# Altium PCB PCB2.PcbDoc
Units mil, origin at the board's own origin, x right, y up, seen from the top; angles counter-clockwise.
Board outline 6000 x 4000 mil, 2 copper layers (Top Layer, Bottom Layer); 73 components, 56 nets, 279 pads, 0 vias.
Unrouted connection lines stored in the file: 188.
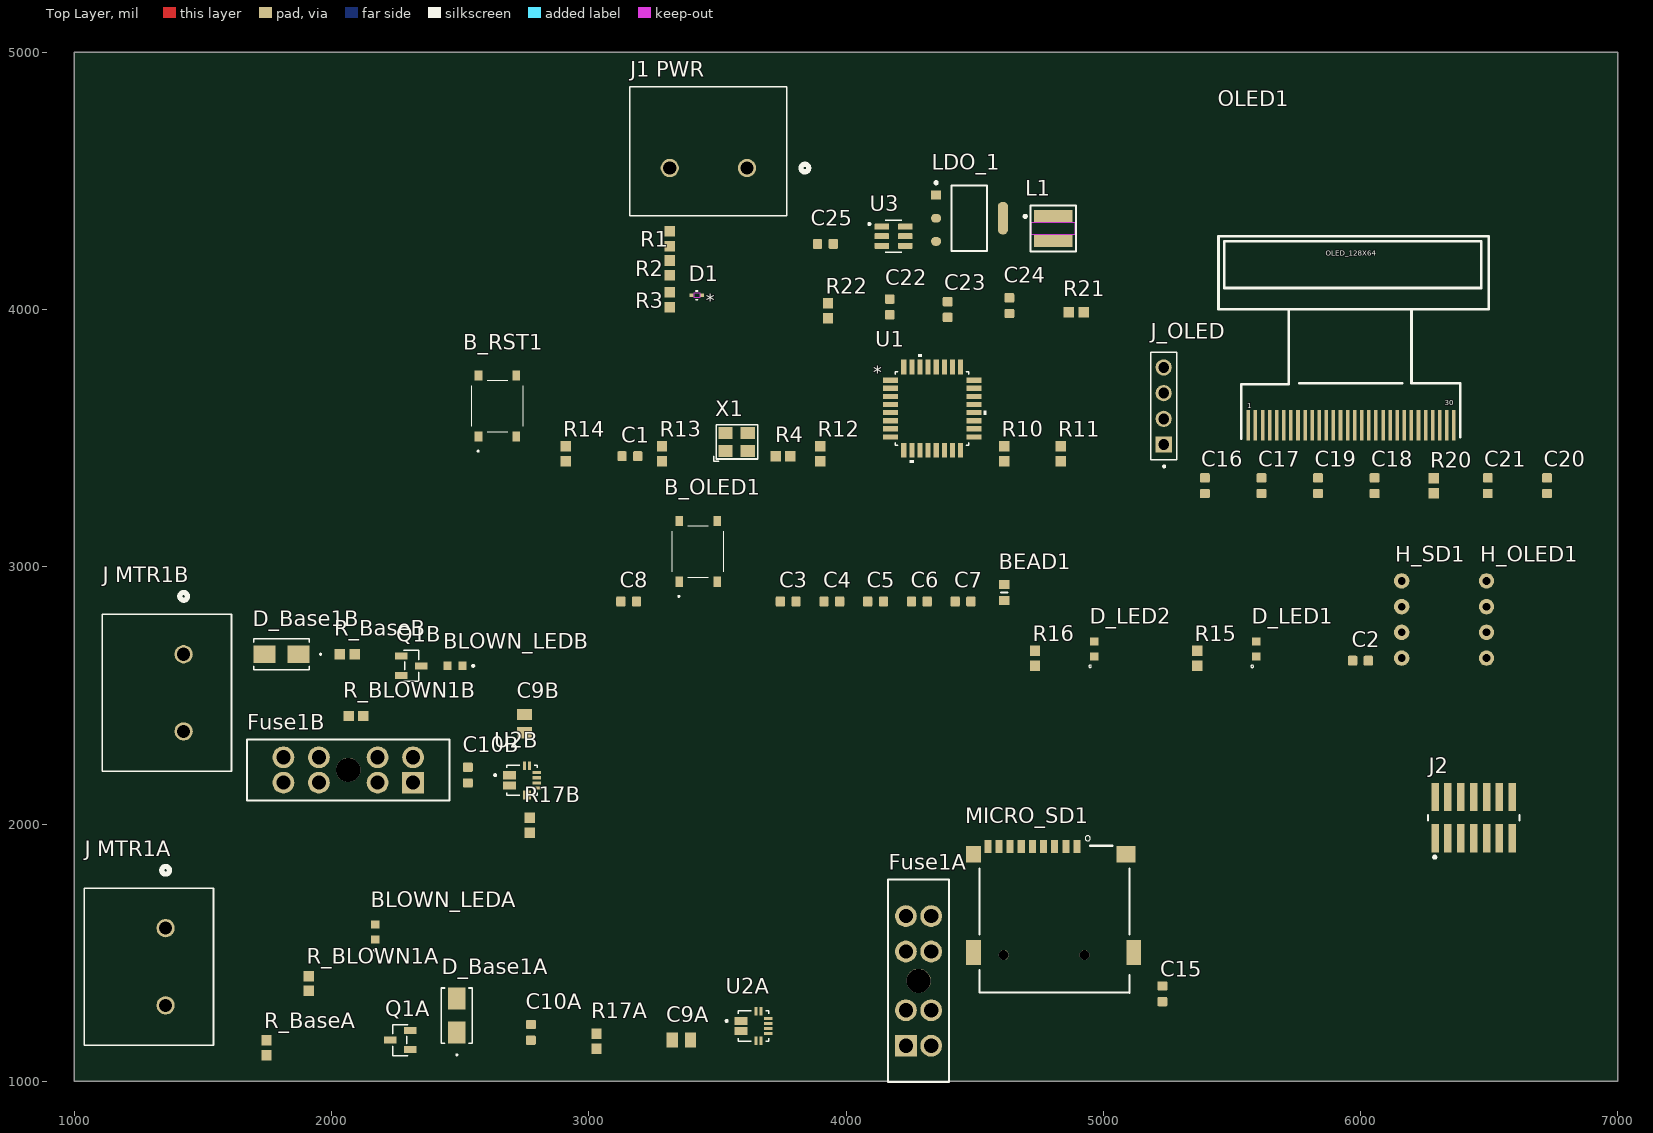
[diagram p0: Top Layer view]
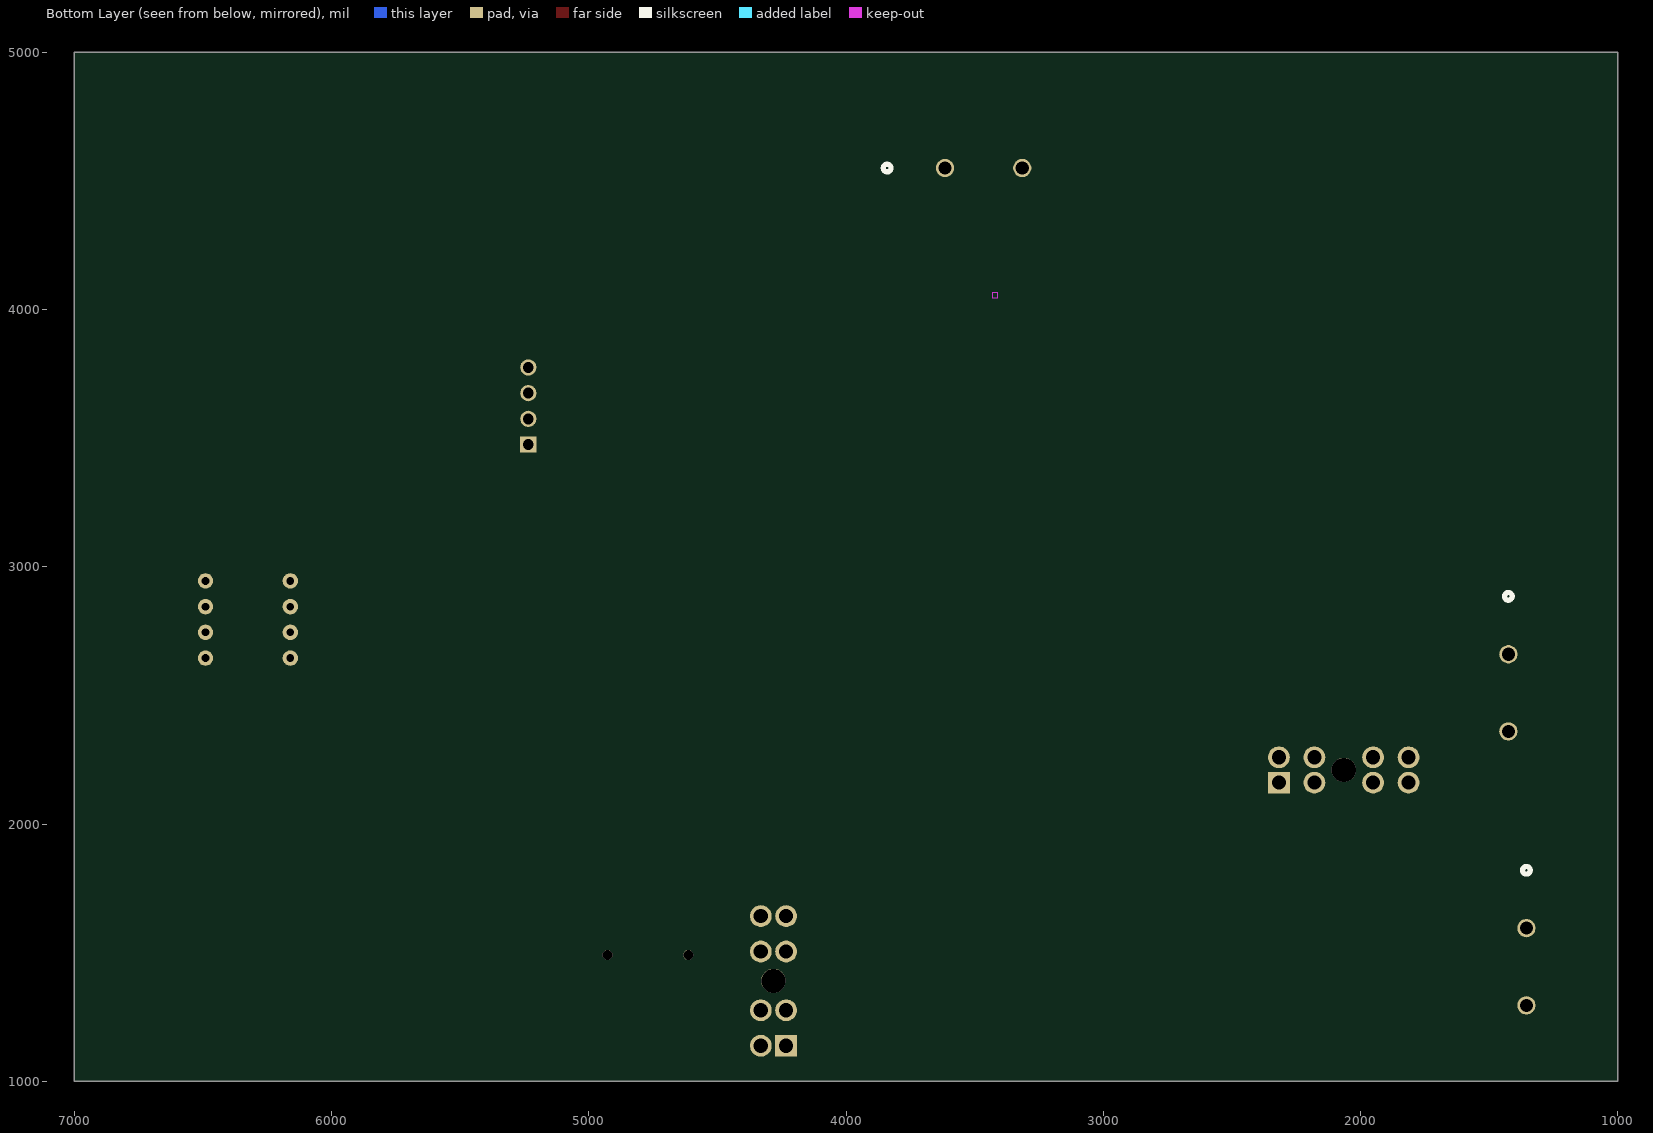
[diagram p1: Bottom Layer view, seen from below]

## Layer stack, top to bottom
Top Solder: solder mask 0.4, Solder Resist, Dk 3.5
Top Layer: signal copper 1.4
Dielectric 1: dielectric 12.6, FR-4, Dk 4.8
Bottom Layer: signal copper 1.4
Bottom Solder: solder mask 0.4, Solder Resist, Dk 3.5

## Board outline
1000,1000 7000,1000 7000,5000 1000,5000

## Design rules (kind name [scope] priority, off if disabled: settings)
Clearance [All] p1: gap=10 ignorepadtopadclearanceinfootprint=FALSE
PolygonConnect [All] p1: connectstyle=Relief reliefconductorwidth=10 reliefentries=4 polygonreliefangle="90 Angle" airgapwidth=10
RoutingVias [All] p1: holewidth=28 width=50 viastyle="Through Hole" minholewidth=28 minwidth=50 maxholewidth=28 maxwidth=50
SolderMaskExpansion [All] p1: expansion=4 istentingtop=FALSE
SupplyNets "Schematic Supply Nets_3" [InNet('3V3')] p1: voltage=0.000
SupplyNets "Schematic Supply Nets_2" [InNet('26V1')] p2: voltage=0.000
SupplyNets "Schematic Supply Nets_1" [InNet('GND')] p3: voltage=0.000
SupplyNets "Schematic Supply Nets" [InNet('AVDD')] p4: voltage=0.000
Width [All] p1: maxlimit=10 minlimit=10 preferedwidth=10
30 further rules are at their usual default settings.

## Classes and differential pairs
channel class Fuse: F1 F2
channel class Ammeter: I1 I2
net class Vi_motor[1..2]: Vi_motor1 Vi_motor2

## Components (designator, comment, footprint, x,y, rotation, side; value= is the part's Value field where it differs from the comment)
B_OLED1 "Button Switch" TS1187ABAB 3425,3060 r90 top
B_RST1 "Button Switch" TS1187ABAB 2645,3625 r90 top
BEAD1 "GZ1608D601TF" BEADC1608X95N 4615,2900 r90 top
BLOWN_LEDA "KT-0603R" LED_KT-0603R 2170,1580 r90 top (schematic designator BLOWN_LED)
BLOWN_LEDB "KT-0603R" LED_KT-0603R 2480,2615 r180 top (schematic designator BLOWN_LED)
C1 "C0603C105K4RACTU" CAPC1608X90N 3160,3430 r0 top value=10nF
C2 "C0603C105K4RACTU" CAPC1608X90N 6000,2635 r0 top value=100nF
C3 "C0603C105K4RACTU" CAPC1608X90N 3775,2865 r0 top value=1uF
C4 "C0603C105K4RACTU" CAPC1608X90N 3945,2865 r0 top value=10nF
C5 "C0603C105K4RACTU" CAPC1608X90N 4115,2865 r0 top value=4.7uF
C6 "C0603C105K4RACTU" CAPC1608X90N 4285,2865 r0 top value=100nF
C7 "C0603C105K4RACTU" CAPC1608X90N 4455,2865 r0 top value=100nF
C8 "C0603C105K4RACTU" CAPC1608X90N 3155,2865 r0 top value=10nF
C9A "CC0805KRX7R9BB104" CAP-0805 3360,1160 r0 top (schematic designator C9)
C9B "CC0805KRX7R9BB104" CAP-0805 2750,2390 r270 top (schematic designator C9)
C10A "C0603C105K4RACTU" CAPC1608X90N 2775,1190 r90 top value=1nF (schematic designator C10)
C10B "C0603C105K4RACTU" CAPC1608X90N 2530,2190 r90 top value=1nF (schematic designator C10)
C15 "C0603C105K4RACTU" CAPC1608X90N 5230,1340 r90 top value=100nF
C16 "C0603C105K4RACTU" CAPC1608X90N 5395,3315 r270 top value=2.2uF
C17 "C0603C105K4RACTU" CAPC1608X90N 5615,3315 r270 top value=2.2uF
C18 "C0603C105K4RACTU" CAPC1608X90N 6055,3315 r270 top value=100nF
C19 "C0603C105K4RACTU" CAPC1608X90N 5835,3315 r270 top value=10uF
C20 "C0603C105K4RACTU" CAPC1608X90N 6725,3315 r270 top value=10uF
C21 "C0603C105K4RACTU" CAPC1608X90N 6495,3315 r270 top value=10uF
C22 "C0603C105K4RACTU" CAPC1608X90N 4170,4010 r90 top value=680nF
C23 "C0603C105K4RACTU" CAPC1608X90N 4395,4000 r90 top value=100nF
C24 "C0603C105K4RACTU" CAPC1608X90N 4635,4015 r90 top value=6.8nF
C25 "C0603C105K4RACTU" CAPC1608X90N 3920,4255 r0 top value=47uF
D1 "DF2S6.2FS,L3M" SOD-923_TOS 3420,4055 r180 top
D_Base1A "Diode" M7_MDD 2487,1255 r90 top (schematic designator D_Base1)
D_Base1B "Diode" M7_MDD 1805,2660 r180 top (schematic designator D_Base1)
D_LED1 "LTST-C190GKT" LEDM1608X80 5595,2680 r90 top
D_LED2 "LTST-C190GKT" LEDM1608X80 4965,2680 r90 top
Fuse1A "178.6165.0002" FP-178_6165-MFG 4282,1390 r90 top (schematic designator Fuse1)
Fuse1B "178.6165.0002" FP-178_6165-MFG 2065,2210 r180 top (schematic designator Fuse1)
H_OLED1 "4-pin Header" "4-pin Header" 6490,2645 r0 top
H_SD1 "4-pin Header" "4-pin Header" 6160,2645 r0 top
"J1 PWR" "1868076" CONN_1868076_PXC 3615,4550 r180 top
J2 "FTSH-107-01-L-DV-K" FP-FTSH-107-01-L-DV-K-MFG 6440,2025 r0 top
"J MTR1A" "1868076" CONN_1868076_PXC 1355,1595 r270 top (schematic designator "J MTR1")
"J MTR1B" "1868076" CONN_1868076_PXC 1425,2660 r270 top (schematic designator "J MTR1")
J_OLED "PPTC041LFBN-RC" SULLINS_PPTC041LFBN-RC 5235,3625 r90 top
L1 "74439325056" WE-XHMI_4040 4805,4315 r0 top
LDO_1 "AMS1117-3.3" FP-AMS1117-IPC_C 4480,4355 r0 top
MICRO_SD1 "TF-01A" TF-01A 4810,1630 r0 top
OLED1 "N096-2864KSWEG01-H30" OLED_0.96-30P-P0.70-12864 5963.78,3549.99 r0 top
Q1A "SS8050(RANGE:200-350)" SOT-23-3_L2.9-W1.3-P1.90-LS2.4-BR 2267,1160 r0 top (schematic designator Q1)
Q1B "SS8050(RANGE:200-350)" SOT-23-3_L2.9-W1.3-P1.90-LS2.4-BR 2310,2615 r180 top (schematic designator Q1)
R1 "RC0603FR-07100KL" RESC1607X60N 3315,4275 r90 top value=300kΩ
R2 "RC0603FR-07100KL" RESC1607X60N 3315,4161.73 r90 top value=510kΩ
R3 "RC0603FR-07100KL" RESC1607X60N 3315,4038.27 r90 top value=100kΩ
R4 "RC0603FR-07100KL" RESC1607X60N 3755,3430 r0 top value=10kΩ
R10 "RC0603FR-07100KL" RESC1607X60N 4615,3440 r90 top value=10kΩ
R11 "RC0603FR-07100KL" RESC1607X60N 4835,3440 r90 top value=10kΩ
R12 "RC0603FR-07100KL" RESC1607X60N 3900,3440 r90 top value=22Ω
R13 "RC0603FR-07100KL" RESC1607X60N 3285,3440 r90 top value=22Ω
R14 "RC0603FR-07100KL" RESC1607X60N 2910,3440 r90 top value=10kΩ
R15 "RC0603FR-07100KL" RESC1607X60N 5365,2645 r90 top value=4.7kΩ
R16 "RC0603FR-07100KL" RESC1607X60N 4735,2645 r90 top value=4.7kΩ
R17A "RC0603FR-07100KL" RESC1607X60N 3030,1155 r90 top value=11kΩ (schematic designator R17)
R17B "RC0603FR-07100KL" RESC1607X60N 2770,1995 r270 top value=11kΩ (schematic designator R17)
R20 "RC0603FR-07100KL" RESC1607X60N 6285,3315 r270 top value=390kΩ
R21 "RC0603FR-07100KL" RESC1607X60N 4895,3990 r0 top value=100kΩ
R22 "RC0603FR-07100KL" RESC1607X60N 3930,3995 r90 top value=13.7kΩ
R_BaseA "RC0603FR-07100KL" RESC1607X60N 1747,1130 r90 top value=10kΩ (schematic designator R_Base)
R_BaseB "RC0603FR-07100KL" RESC1607X60N 2061.06,2660 r0 top value=10kΩ (schematic designator R_Base)
R_BLOWN1A "RC0603FR-07100KL" RESC1607X60N 1912,1380 r90 top value=12kΩ (schematic designator R_BLOWN1)
R_BLOWN1B "RC0603FR-07100KL" RESC1607X60N 2095,2420 r180 top value=12kΩ (schematic designator R_BLOWN1)
U1 "STM32L412KBT6" LQFP-32 4335,3615 r0 top
U2A "ACS711KEXLT-15AB-T" XDCR_ACS711KEXLT-15AB-T 3640,1215 r0 top (schematic designator U2)
U2B "ACS711KEXLT-15AB-T" XDCR_ACS711KEXLT-15AB-T 2740,2170 r0 top (schematic designator U2)
U3 "TPS561201DDCT" SOT95P280X110-6N 4185,4285 r0 top
X1 "32.768kHz" OSC-SMD_4P-L3.2-W2.5-BL 3575,3485 r0 top

## Footprints (in the part's own frame and the unit in brackets; to place one, negate y for a bottom-side part, rotate by r counter-clockwise, add the part's x,y. Pads: shape width x height; smd on the part's side, far side on the other; paste and mask are expansions set on the pad)
"4-pin Header" [mil]
  round 60 hole 30: 1(0,0) 2(0,100) 3(0,200) 4(0,300)
BEADC1608X95N [mm]
  rect 0.9x1 smd: 1(-0.8,0) 2(0.8,0)
  silkscreen extent 0,-0.3 0,0.3, body extent -0.8,-0.4 0.8,0.4, height 0.95
CAP-0805 [mm] "Chip Capacitor, 2-Leads, Body 2.00x1.25mm, IPC Medium Density"
  rect 1.1x1.45 smd: 1(-0.9,0) 2(0.9,0)
  body extent -1.05,-0.7 1.05,0.7, height 0.6
CAPC1608X90N [mm]
  rrect25% 0.92x0.97 smd: 1(-0.775,0) 2(0.775,0)
  body extent -0.8,-0.4 0.8,0.4, height 0.9
CONN_1868076_PXC [mil]
  round 71 / inner round 60 / far side round 71 hole 51 paste-99999 mask+0: 1(0,0) 2(300,0)
  silkscreen extent -240,-316 455,186
FP-178_6165-MFG [mm]
  round 2.15 hole 1.4 paste-2539.97 mask+0: 1(-6.4,-1.25) 1(-2.9,-1.25) 1(-2.9,1.25) 2(2.9,-1.25) 2(2.9,1.25) 2(6.4,-1.25) 2(6.4,1.25)
  rect 2.15x2.15 hole 1.4 paste-2539.97 mask+0: 1(-6.4,1.25)
  round 2.4 hole 2.4 unplated paste-2539.97 mask+0: ""(0,0)
  silkscreen extent -10,-3 10,3, body extent -10.1,-3.1 10.1,3.1, height 0.25
FP-AMS1117-IPC_C [mm]
  rect 1.004x0.872 smd paste+0 mask+0: 1(-3.295,2.29)
  rrect100% 1.004x0.872 smd paste+0 mask+0: 2(-3.295,0) 3(-3.295,-2.29)
  rrect87% 1.004x3.182 smd paste+0 mask+0: 4(3.295,0)
  silkscreen extent -3.42,-3.25 1.75,3.62, body extent -3.9,-3.35 3.9,3.35, height 0.25
FP-FTSH-107-01-L-DV-K-MFG [mm]
  rect 0.74x2.79 smd paste+0 mask+0: 1(-3.81,-2.035) 2(-3.81,2.035) 3(-2.54,-2.035) 4(-2.54,2.035) 5(-1.27,-2.035) 6(-1.27,2.035) 7(0,-2.035) 8(0,2.035) 9(1.27,-2.035) 10(1.27,2.035) 11(2.54,-2.035) 12(2.54,2.035) 13(3.81,-2.035) 14(3.81,2.035)
  silkscreen extent -4.51,-4.04 4.51,0.27, body extent -4.61,-3.53 4.61,3.53, height 0.25
LED_KT-0603R [mm]
  rect 0.8x0.8 smd: A(0.75,0) C(-0.75,0)
  silkscreen extent -1.9,-0.1 -1.7,0.1, body extent -0.8,-0.4 0.8,0.4, height 0.65
LEDM1608X80 [mm]
  rect 0.8x0.8 smd: A(0.75,0) C(-0.75,0)
  silkscreen extent -1.83,0.27 -1.57,0.53
LQFP-32 [mil]
  rect 58x20 smd paste+0 mask+0: 1(-162,110.24) 2(-162,78.74) 3(-162,47.24) 4(-162,15.75) 5(-162,-15.75) 6(-162,-47.24) 7(-162,-78.74) 8(-162,-110.24) 17(162,-110.24) 18(162,-78.74) 19(162,-47.24) 20(162,-15.75) 21(162,15.75) 22(162,47.24) 23(162,78.74) 24(162,110.24)
  rect 20x58 smd paste+0 mask+0: 9(-110.24,-162) 10(-78.74,-162) 11(-47.24,-162) 12(-15.75,-162) 13(15.75,-162) 14(47.24,-162) 15(78.74,-162) 16(110.24,-162) 25(110.24,162) 26(78.74,162) 27(47.24,162) 28(15.75,162) 29(-15.75,162) 30(-47.24,162) 31(-78.74,162) 32(-110.24,162)
  silkscreen extent -143,-211 211,211, body extent -177,-177 177,177, height 63
M7_MDD [mil]
  rect 85x67 smd paste+0 mask+0: 1(-66,0) 2(66,0)
  silkscreen extent -155,-60 108,60, body extent -103,-55 103,55, height 89
OLED_0.96-30P-P0.70-12864 [mm]
  rect 0.351x3 smd: 1(-10.15,0.002) 2(-9.45,0) 3(-8.75,0) 4(-8.05,0) 5(-7.35,0) 6(-6.65,0) 7(-5.95,0) 8(-5.25,0) 9(-4.55,0) 10(-3.85,0) 11(-3.15,0) 12(-2.45,0) 13(-1.75,0) 14(-1.05,0) 15(-0.35,0) 16(0.35,0) 17(1.05,0) 18(1.75,0) 19(2.45,0) 20(3.15,0) 21(3.85,0) 22(4.55,0) 23(5.25,0) 24(5.95,0) 25(6.65,0) 26(7.35,0) 27(8.05,0) 28(8.75,-0.001) 29(9.45,-0.002) 30(10.15,-0.002)
  silkscreen extent -13.1,-1.3 13.6,18.67
OSC-SMD_4P-L3.2-W2.5-BL [mm]
  rect 1.4x1.2 smd: 1(-1.1,-0.875) 2(1.1,-0.875) 3(1.1,0.875) 4(-1.1,0.875)
  silkscreen extent -2.29,-1.9 2.07,1.72
RESC1607X60N [mm]
  rect 1.04x1.02 smd: 1(-0.735,0) 2(0.735,0)
  body extent -0.8,-0.4 0.8,0.4, height 0.55
SOD-923_TOS [mil]
  rect 16x14 smd paste+0 mask+0: 1(-20.5,0) 2(20.5,0)
  Top Layer keep-out region: -10.5,-10 -10.5,10 10.5,10 10.5,-10
  Keep-Out Layer region: -10.5,-10 -10.5,10 10.5,10 10.5,-10
  silkscreen extent -4,-17 4,17, body extent -21,-12 21,12, height 18
SOT95P280X110-6N [mm]
  rrect25% 1.45x0.59 smd paste+0 mask+0.102: 1(-1.155,0.95) 2(-1.155,0) 3(-1.155,-0.95) 4(1.155,-0.95) 5(1.155,0) 6(1.155,0.95)
  silkscreen extent -2.5,-1.57 0.8,1.57, body extent -1.4,-1.45 1.4,1.45, height 1.1
SOT-23-3_L2.9-W1.3-P1.90-LS2.4-BR [mm]
  rect 1.25x0.7 smd: 1(1,-0.95) 2(1,0.95) 3(-1,0)
  silkscreen extent -0.73,-1.53 0.73,1.53
SULLINS_PPTC041LFBN-RC [mm]
  rect 1.605x1.605 / inner round 1.605 / far side rect 1.605x1.605 hole 1.07: 1(-3.81,0)
  round 1.605 hole 1.07: 2(-1.27,0) 3(1.27,0) 4(3.81,0)
  silkscreen extent -6.06,-1.27 5.33,1.27, body extent -5.33,-1.27 5.33,1.27, height 8.51
TF-01A [mm]
  rect 0.7x1.3 smd: 1(2.23,7.174) 2(1.13,7.174) 3(0.03,7.174) 4(-1.07,7.174) 5(-2.17,7.174) 6(-3.27,7.174) 7(-4.37,7.174) 8(-5.47,7.174) CD1(-6.57,7.174)
  rect 1.448x1.651 smd: MP1(-7.989,6.4)
  rect 1.448x2.438 smd: MP2(-7.989,-3.3) MP3(7.836,-3.3)
  rect 1.854x1.651 smd: MP4(7.061,6.4)
  round 1 hole 1 unplated: ""(-5.004,-3.531) ""(2.972,-3.531)
  silkscreen extent -7.4,-7.26 7.4,8.24, body extent -7.94,-7.69 8.16,7.51, height 2
TS1187ABAB [mm]
  rect 1x0.75 smd: A1(-3,1.875) B1(3,1.875) C1(-3,-1.875) D1(3,-1.875)
  silkscreen extent -4.5,-2.55 2.55,2.55, body extent -3.2,-2.55 3.3,2.55, height 1.5
WE-XHMI_4040 [mm] "SMD Power Inductor, body 4.30 x 4.30 mm"
  rect 3.8x1.2 smd: 1(0,1.225) 2(0,-1.225)
  Top Layer keep-out region: -2.15,0.625 2.15,0.625 2.15,-0.625 -2.15,-0.625
  silkscreen extent -2.87,-2.25 2.25,2.25, body extent -2.15,-2.15 2.15,2.15, height 4.11
XDCR_ACS711KEXLT-15AB-T [mm]
  rect 1.27x0.8 smd mask+0: 1(-1.235,0.5) 3(-1.235,-0.5)
  rect 0.3x0.85 smd mask+0.025: 5(0.25,-1.45) 6(0.75,-1.45) 11(0.75,1.45) 12(0.25,1.45)
  rect 0.85x0.3 smd mask+0.025: 7(1.45,-0.75) 8(1.45,-0.25) 9(1.45,0.25) 10(1.45,0.75)
  silkscreen extent -2.73,-1.5 1.5,1.5, body extent -3,-2.45 3,2.45, height 1.75

## Part data
B_OLED1 B_RST1: library part TS-1187A-B-A-B, Manufacturer_Name="XKB Connectivity", Datasheet Link=http://www.helloxkb.com/public/images/pdf/TS-1187A-X-X-X.pdf, Height=4.05mm, Manufacturer_Part_Number=TS-1187A-B-A-B
BEAD1: "Ferrite Bead", Manufacturer_Name=SUNLORD, Datasheet Link=https://datasheet.lcsc.com/szlcsc/Sunlord-GZ1608D601TF_C1002.pdf, Height=0.95mm, Manufacturer_Part_Number=GZ1608D601TF
BLOWN_LEDA BLOWN_LEDB: "Red 0603 Light Emitting Diodes", Package=Package, Check_prices=https://www.snapeda.com/parts/KT-0603R/Hubei+KENTO+Elec/view-part/?ref=eda, MF="Hubei KENTO Elec", MP=KT-0603R, SnapEDA_Link=https://www.snapeda.com/parts/KT-0603R/Hubei+KENTO+Elec/view-part/?ref=snap
C1 C2 C3 C4 C5 C6 C7 C8 C10A C10B C15 C16 C17 C18 C19 C20 C21 C22 C23 C24 C25 D_LED1 D_LED2: Package=None, Availability=Unavailable, Price=None
  C1 C2 C3 C4 C5 C6 C7 C8 C10A C10B C15 C16 C17 C18 C19 C20 C21 C22 C23 C24 C25: MP=C0603C105K4RACTU
  D_LED1 D_LED2: MF="{'manufacturer': u'Lite-On Inc.'}", MP=LTST-C190GKT
C9A C9B: "Capacitor, Ceramic (MLCC), 100nF, ±10%, 50V, X7R, ±10%, SMD 0805", Capacitance=100nF, JLCPCB Basic Part=Yes, JLCPCB Part Number=C49678, Manufacturer=YAGEO, Package Size=0805, Temperature Coefficient=X7R, Tolerance=±10%, Voltage Rating=50V, Category="Capacitors - MLCC", ComponentLink1Description=Datasheet, ComponentLink1URL=https://wmsc.lcsc.com/wmsc/upload/file/pdf/v2/lcsc/2304140030_YAGEO-CC0805KRX7R9BB104_C49678.pdf, ComponentLink2Description="JLCPCB Part URL", ComponentLink2URL=https://jlcpcb.com/partdetail/C49678, ComponentLink3Description="LCSC Part URL", ComponentLink3URL=https://lcsc.com/product-detail/Multilayer-Ceramic-Capacitors-MLCC---SMD-SMT_YAGEO-YAGEO-CC0805KRX7R9BB104_C49678.html, Manufacturer Part Number=CC0805KRX7R9BB104, RoHS=Yes, Supplier 1=LCSC, Supplier Part Number 1=C49678
D1: "Unidirectional TVS Diode (ESD Protection Diode), 5.0 V, SOD-923", Manufacturer_Name="Toshiba Electronic Devices & Storage Corp.", Copyright="Copyright (C) 2026 Ultra Librarian. All rights reserved.", Manufacturer_Part_Number=DF2S6.2FS,L3M, RefDes=RefDes, Type=Type
D_Base1A D_Base1B: library part M7, "1A Independent Type 1kV 1.1V@1A SMA(DO-214AC) Diodes - General Purpose ROHS", Mfr_Name="Microdiode Electronics"
Fuse1A Fuse1B: library part CMP-08604-000022-1, "FUSE HOLDER BLADE 80V PCB", Manufacturer=Littelfuse, Package=178.6165, Voltage Rating Ac=80V, Automotive=No, Category=Fuse, ComponentLink2Description=Datasheet, ComponentLink2URL=https://www.littelfuse.com/~/media/commercial-vehicle/datasheets/automotive-fuse-holders/ato/littelfuse-fuse-holder-ato-flr-pcb-datasheet.pdf, Conn Orientation=Vertical, Device Class L1="Circuit Protection", Device Class L2="Fuse Holders", Device Class L3=unset, Digikey Description="FUSE HOLDER BLADE 80V PCB", Height=17.5mm, Lead Free=Yes, Manufacturer Part Number=178.6165.0002, Mouser Description="Fuse Holder FLR (ATO) PCB 4-pin Holder", Number Of Fuses=1, Octopart=https://octopart.com/178.6165.0002-littelfuse-13138759, RoHS=TRUE, Standoff Height=1mm, Voltage Rating Dc=80V
H_OLED1 H_SD1: "4-pin Header 0.1mm pitch"
"J1 PWR" "J MTR1A" "J MTR1B": "PCB terminal block, nominal current: 32 A, nom. voltage: 630 V, pitch: 7.62 mm, number of positions: 2, connection method: Screw connection with tension sleeve, mounting: Wave soldering, conductor/PCB connection direction: 0 Â°, color: green. The article can be aligned to create different nos. of positions!", Manufacturer_Name="Phoenix Contact", Copyright="Copyright (C) 2025 Ultra Librarian. All rights reserved.", Manufacturer_Part_Number=1868076, RefDes=RefDes, Type=Type
J2: library part CMP-02766-001412-1, "CONN HEADER SMD 14POS 1.27MM", Housing Color=Black, Max Operating Temperature=125°C, Min Operating Temperature=-55°C, Contact Material=Bronze, Contact Plating=Gold, Depth=5.84mm, Gender=Male, Housing Material=Polymer, Lead Free="Lead Free", Length=8.89mm, Number of Contacts=14, Number of Rows=2, Orientation=Straight, Packaging=Rail/Tube, Pitch=1.27mm, Radiation Hardening=No, RoHS Compliant=Yes, Termination=Solder
J_OLED: "4 Position Header Connector 0.100 (2.54mm) Through Hole Tin", Package=None, Check_prices=https://www.snapeda.com/parts/PPTC041LFBN-RC/Sullins/view-part/?ref=eda, MF="Sullins Connector", MP=PPTC041LFBN-RC, SnapEDA_Link=https://www.snapeda.com/parts/PPTC041LFBN-RC/Sullins/view-part/?ref=snap
L1: library part CMP-03913-148605660-1, "Power Inductor, 5.6UH, Shielded, 5.1A Rohs Compliant: Yes"
LDO_1: library part CMP-209535-000001-1, "LDO Voltage Regulators 1A, 3.3V", Dropout Voltage=1.1V, Manufacturer="Advanced Monolithic Systems", Max Junction Temp=+125°C, Max Power Dissipation=1.2W, Max Supply Voltage=15V, Nominal Supply Current=5mA, Output Current=1A, Output Voltage=3.3V, Package=AMS1117, Temperature="-40°C to +125°C", Temperature Range Low=-40°C, Automotive=No, Category=IC, ComponentLink2Description=Datasheet, ComponentLink2URL=http://www.advanced-monolithic.com/pdf/ds1117.pdf, Device Class L1="Integrated Circuits (ICs)", Device Class L2="Power Management ICs", Device Class L3="Voltage Regulators - Linear", Height=1.8mm, Ipc Land Pattern Name=SOT229P700X180-4, Lead Free=Yes, Manufacturer Part Number=AMS1117-3.3, Number of Outputs=1, Octopart=https://octopart.com/ams1117-3.3-advanced+monolithic+systems-25899300, Output Type=Fixed, RoHS=TRUE, Standoff Height=0.64mm, Temperature Range High=+125°C
MICRO_SD1: "Standard Card Edge Connectors", Package=Package, Availability="Not in stock", Check_prices=https://www.snapeda.com/parts/TF-01A/HRO+Electronics+Co.%252C+Ltd./view-part/?ref=eda, MF="HRO Electronics Co., Ltd.", MP=TF-01A, Price=None, SnapEDA_Link=https://www.snapeda.com/parts/TF-01A/HRO+Electronics+Co.%252C+Ltd./view-part/?ref=snap
OLED1: JLCPCB Part Class="Extended Part", LCSC Part Name="0.96寸 白色 128x64像素分辨率 单色 30PIN", Manufacturer=Newvision(新智景), Add into BOM=yes, Convert to PCB=yes, Device=N096-2864KSWEG01-H30, Main Control Chip=SSD1306, Manufacturer Part=N096-2864KSWEG01-H30, Size=0.96, Supplier=LCSC, Supplier Footprint=-, Supplier Part=C2890596, Symbol=N096-2864KSWEG01-H30
Q1A Q1B: library part SS8050(RANGE:200-350)_C2150, "BJT NPN", Collector Cut-Off Current (Icbo)=100nA, Collector-Emitter Saturation Voltage (VCE(sat)@Ic,Ib)=500mV@800mA,80mA, DC Current Gain (hFE@Ic,Vce)=200@800mA,1V, JLCPCB Part Class="Basic Part", LCSC Part Name="NPN 电流:1.5A 耐压:25V hfe=200~350", Manufacturer=CJ(江苏长电/长晶), Operating Temperature=-55℃~+150℃, Transition Frequency (fT)=100MHz, Add into BOM=yes, Convert to PCB=yes, Datasheet=https://atta.szlcsc.com/upload/public/pdf/source/20230322/AEE86F4B043774EFF80CAEA14A37D9E9.pdf, Device=SS8050(RANGE:200-350)_C2150, Manufacturer Part=SS8050(RANGE:200-350), Supplier=LCSC, Supplier Footprint=SOT-23, Supplier Part=C2150, Symbol=SS8050_C2150
R1 R2 R3 R4 R10 R11 R12 R13 R14 R15 R16 R17A R17B R20 R21 R22 R_BaseA R_BaseB R_BLOWN1A R_BLOWN1B: "100 kOhms Â±1% 0.1W, 1/10W Chip Resistor 0603 (1608 Metric) Moisture Resistant Thick Film", Package="0603 Yageo", Check_prices=https://www.snapeda.com/parts/RC0603FR-07100KL/Yageo/view-part/?ref=eda, MF=Yageo, MP=RC0603FR-07100KL, SnapEDA_Link=https://www.snapeda.com/parts/RC0603FR-07100KL/Yageo/view-part/?ref=snap
U1: "No Description Available", Mfr_Name=STMicroelectronics, RefDes=RefDes, Type=Type
U2A U2B: "Current Sensor 15.5A 1 Channel Hall Effect, Open Loop Bidirectional 12-PowerWFQFN", Package="PowerWFQFN-12 Allegro MicroSystems LLC", Check_prices=https://www.snapeda.com/parts/ACS711KEXLT-15AB-T/Allegro/view-part/?ref=eda, MF="Allegro MicroSystems LLC", MP=ACS711KEXLT-15AB-T, SnapEDA_Link=https://www.snapeda.com/parts/ACS711KEXLT-15AB-T/Allegro/view-part/?ref=snap
U3: "4.5V to 17V Input, 1A Synchronous Step-Down Voltage Regulator in 6-pin SOT-23", Package="SOT-23-THN-6 Texas Instruments", Check_prices=https://www.snapeda.com/parts/TPS561201DDCT/Texas+Instruments/view-part/?ref=eda, MF="Texas Instruments", MP=TPS561201DDCT, SnapEDA_Link=https://www.snapeda.com/parts/TPS561201DDCT/Texas+Instruments/view-part/?ref=snap
X1: library part SX3M32.768KM20F30TNN, Current - Supply=90uA, Frequency Stability=±30ppm, JLCPCB Part Class="Extended Part", LCSC Part Name="32.768kHz ±20ppm 1.62V~3.63V CMOS", Manufacturer=SCTF(星通时频), Normal temperature Frequency Tolerance=±20ppm, Operating Temperature=-40℃~+85℃, Voltage - Supply=1.62V~3.63V, Add into BOM=yes, Convert to PCB=yes, Datasheet=https://atta.szlcsc.com/upload/public/pdf/source/20240605/38A6F081BC26201D4BADAAB4D2EED01C.pdf, Device=SX3M32.768KM20F30TNN, Manufacturer Part=SX3M32.768KM20F30TNN, Output Type=CMOS, Supplier=LCSC, Supplier Footprint=SMD3225-4P, Supplier Part=C2901582, Symbol=SX3M32.768KM20F30TNN

## Nets (pads, with @x,y where several pads share a name; then routed paths per layer and width w, separated by ;. In a path a pad name is that pad's centre, name@x,y a point inside that pad or via, vN(x,y) a via of type N, cw(c..) or ccw(c..) an arc to the next point about the centre after c; other vN are vias at no path point)
3V3: C1.2 C9A.2 C9B.2 C15.2 C18.2 C19.2 J2.3 J_OLED.2 MICRO_SD1.4 OLED1.6 OLED1.9 OLED1.11 R4.2 R10.1 R11.1 R17A.2 R17B.2 U2A.12 U2B.12 X1.4
26V1: "J1 PWR.2" C22.1 R1.2 U2A.1 U2B.1 U3.3
\C\S\: H_SD1.4 MICRO_SD1.2 R4.1 U1.20
ADC1_IN8: U1.9
AVDD: BEAD1.2 C3.2 C4.2 U1.5
BOOT0: R14.1 U1.31
CardDetect: MICRO_SD1.CD1 U1.19
GND: "J1 PWR.1" "J MTR1A.2" "J MTR1B.2" B_OLED1.C1 B_OLED1.D1 B_RST1.C1 B_RST1.D1 BLOWN_LEDA.C BLOWN_LEDB.C C1.1 C2.1 C3.1 C4.1 C5.1 C6.1 C7.1 C8.1 C9A.1 C9B.1 C10A.2 C10B.2 C15.1 C18.1 C19.1 C20.2 C21.2 C22.2 C25.2 D_LED1.C D_LED2.C J2.5 J2.7 J2.11 J_OLED.1 LDO_1.1 MICRO_SD1.6 MICRO_SD1.MP1 MICRO_SD1.MP2 MICRO_SD1.MP3 MICRO_SD1.MP4 OLED1.1 OLED1.8 OLED1.10 OLED1.12 OLED1.13 OLED1.15 OLED1.16 OLED1.17 OLED1.29 OLED1.30 Q1A.2 Q1B.2 R3.1 R14.2 R20.1 R22.1 U1.16 U1.32 U2A.5 U2B.5 U3.1 X1.2
I2C1_SCL: H_OLED1.2 J_OLED.3 OLED1.18 R10.2 U1.29
I2C1_SDA: H_OLED1.1 J_OLED.4 OLED1.19 OLED1.20 R11.2 U1.30
LED1: R15.2 U1.15
LED2: R16.2 U1.14
LSE_EN: U1.3 X1.1
LSE_Out: U1.2 X1.3
MCU_VCP_RX: J2.14 U1.25
MCU_VCP_TX: J2.13 U1.8
NetBLOWN_LEDA_A: BLOWN_LEDA.A Q1A.3 R_BLOWN1A.1
NetBLOWN_LEDB_A: BLOWN_LEDB.A Q1B.3 R_BLOWN1B.1
NetC16_1: C16.1 OLED1.2
NetC16_2: C16.2 OLED1.3
NetC17_1: C17.1 OLED1.4
NetC17_2: C17.2 OLED1.5
NetC20_1: C20.1 C21.1 OLED1.27 OLED1.28
NetC23_1: C23.1 L1.1 U3.2
NetC23_2: C23.2 U3.6
NetC24_1: C24.1 C25.1 L1.2 LDO_1.3 R21.2
NetC24_2: C24.2 R21.1 R22.2 U3.4
NetD1_1: D1.1 U3.5
NetD_Base1A_1: D_Base1A.1 R_BaseA.1
NetD_Base1A_2: "J MTR1A.1" D_Base1A.2 Fuse1A.2
NetD_Base1B_1: D_Base1B.1 R_BaseB.1
NetD_Base1B_2: "J MTR1B.1" D_Base1B.2 Fuse1B.2
NetD_LED1_A: D_LED1.A R15.1
NetD_LED2_A: D_LED2.A R16.1
NetOLED1_26: OLED1.26 R20.2
NetQ1A_1: Q1A.1 R_BaseA.2
NetQ1B_1: Q1B.1 R_BaseB.2
NetR1_1: R1.1 R2.2
NetR12_1: R12.1 U1.26
NetR13_2: R13.2 U1.23
NetR17A_1: R17A.1 U2A.6
NetR17B_1: R17B.1 U2B.6
NRST: B_RST1.A1 B_RST1.B1 C2.2 J2.12 U1.4
OLED_NRST: H_OLED1.3 OLED1.14 U1.28
OLED_TOGGLE: B_OLED1.A1 B_OLED1.B1 C8.2 H_OLED1.4 U1.27
OPAMP1_VINP: D1.2 R2.1 R3.2 U1.6
SPI1_MISO: H_SD1.1 MICRO_SD1.7 U1.21
SPI1_MOSI: H_SD1.3 MICRO_SD1.3 U1.22
SPI1_SCK: H_SD1.2 MICRO_SD1.5 U1.7
SWCLK: J2.6 U1.24
SWDIO: J2.4 R13.1
SWO: J2.8 R12.2
Vi_motor1: C10A.1 U1.10 U2A.11
Vi_motor2: C10B.1 U1.11 U2B.11
Vmotor1: Fuse1A.1 R_BLOWN1A.2 U2A.3
Vmotor2: Fuse1B.1 R_BLOWN1B.2 U2B.3
pads on no net: BEAD1.1 C5.2 C6.2 C7.2 Fuse1A. Fuse1B. J2.1 J2.2 J2.9 J2.10 LDO_1.2 LDO_1.4 MICRO_SD1. MICRO_SD1.1 MICRO_SD1.8 OLED1.7 OLED1.21 OLED1.22 OLED1.23 OLED1.24 OLED1.25 U1.1 U1.12 U1.13 U1.17 U1.18 U2A.7 U2A.8 U2A.9 U2A.10 U2B.7 U2B.8 U2B.9 U2B.10

## Text inside footprints (layer, text, board x,y; h text height)
D1: Top Overlay "*" at 3490,4080 h50 r180; Mechanical 13 "*" at 3438.5,4080 h50 r180
OLED1: Top Overlay "1" at 5560.24,3616.92 h20; Top Overlay "30" at 6327.17,3627.15 h20; Top Overlay "OLED_128X64" at 5864.78,4209.32 h20
U1: Top Overlay "*" at 4106.5,3730.98 h50; Mechanical 13 "*" at 4199.5,3715.98 h50